# EAGLE board Case_c (EAGLE 9.7.0)

Size 421.2 x 166.83 mm. Coordinates in mm from the lower left corner, seen from the top.
Outline: 0,0 421.2,0 421.2,166.83 0,166.83 0,0
Copper layers (1*16): Top 0.035mm / dielectric 1.5mm / Bottom 0.035mm
Design rules "default": minimum track width 6mil, minimum drill 0.35mm, track to track 6mil, track to pad 6mil, pad to pad 6mil, via to via 6mil, smd to smd 6mil, copper to edge 40mil, drill to drill 6mil, minimum pad ring 10mil, minimum via ring 8mil, stop-mask expansion 4mil, vias tented up to drill 0mil, thermal gap 10mil

## Footprints (pad centres in the part's own frame; a part is rotated, then mirrored left to right if it is on the bottom)
LEDRD254W60D565H860B_G = drill 0.981 pad 1.581: 1 -1.27,0; 2 1.27,0
LEDRD254W60D565H860B = drill 0.981 pad 1.581: 1 -1.27,0; 2 1.27,0
LEDRD254W60D565H860B_Y = drill 0.981 pad 1.581: 1 -1.27,0; 2 1.27,0
PIEZO = drill 1 pad 1.6: 1 -3.5,0; 2 3.5,0
1X02 = drill 1.016 long: 1 -1.27,0; 2 1.27,0
RESAD1016W63L850D250B = drill 0.83 pad 1.43: 1 -5.08,0; 2 5.08,0
SWITCH-MOMENTARY-PTH-6.5MM = drill 1.016 pad 1.88: 1 -3.251,2.261; 2 3.251,2.261; 3 -3.251,-2.261; 4 3.251,-2.261
SG90 = drill 1.016 long: 1 -2.54,0; 2 0,0; 3 2.54,0
ARDUINO-UNO-R3-SHIELD = drill 1.016 pad 1.88: 3.3V 24.13,-2.54; 5V 24.13,0; A0 24.13,12.7; A1 24.13,15.24; A2 24.13,17.78; A3 24.13,20.32; A4 24.13,22.86; A5 24.13,25.4; AREF -24.13,-13.97; D2 -24.13,20.32; D3 -24.13,17.78; D4 -24.13,15.24; D5 -24.13,12.7; D6 -24.13,10.16; D7 -24.13,7.62; D8 -24.13,3.81; D9 -24.13,1.27; D10 -24.13,-1.27; D11 -24.13,-3.81; D12 -24.13,-6.35; D13 -24.13,-8.89; GND@0 24.13,2.54; GND@1 24.13,5.08; GND@2 -24.13,-11.43; IOREF 24.13,-7.62; NC 24.13,-10.16; RES 24.13,-5.08; RX -24.13,25.4; SCL -24.13,-19.05; SDA -24.13,-16.51; TX -24.13,22.86; VIN 24.13,7.62

## Placement (x,y rotation side)
DRG1  GREEN  [LEDRD254W60D565H860B_G]  334.71,129.97 180 top
DRG2  GREEN  [LEDRD254W60D565H860B_G]  203.36,156.04 180 top
DRR1  RED  [LEDRD254W60D565H860B]  368.91,130.31 180 top
DRR2  RED  [LEDRD254W60D565H860B]  237.89,156.04 180 top
DRW1  RED  [LEDRD254W60D565H860B]  93.88,158.92 180 top
DRW2  RED  [LEDRD254W60D565H860B]  124.18,158.45 180 top
DRY1  YELLOW  [LEDRD254W60D565H860B_Y]  351.64,130.65 180 top
DRY2  YELLOW  [LEDRD254W60D565H860B_Y]  222.32,156.38 180 top
PIEZO1  PIEZO  [PIEZO]  274.11,141.39 0 top
R1  FORCE-SENSOR  [1X02]  260.23,57.77 0 top
R2  470  [RESAD1016W63L850D250B]  335.98,124.89 90 top
R3  470  [RESAD1016W63L850D250B]  352.91,125.57 90 top
R4  470  [RESAD1016W63L850D250B]  370.18,125.23 90 top
R5  470  [RESAD1016W63L850D250B]  204.63,150.96 90 top
R6  470  [RESAD1016W63L850D250B]  223.59,151.3 90 top
R7  470  [RESAD1016W63L850D250B]  239.16,150.96 90 top
R8  330  [RESAD1016W63L850D250B]  95.15,153.84 90 top
R9  330  [RESAD1016W63L850D250B]  125.45,153.37 90 top
R10  220  [RESAD1016W63L850D250B]  259.25,136.67 90 top
RFSR1  FORCE-SENSOR  [1X02]  415.49,59.27 0 top
RR_BY2  470k  [RESAD1016W63L850D250B]  294.77,104.92 90 top
RR_BYP1  470k  [RESAD1016W63L850D250B]  356.49,8.97 90 top
RR_PD1  10k  [RESAD1016W63L850D250B]  329.64,17.23 90 top
RR_PD2  10k  [RESAD1016W63L850D250B]  311.69,104.58 90 top
S1  SWITCH_MOMENTARY  [SWITCH-MOMENTARY-PTH-6.5MM]  186.2,44.87 90 top
SERVO1  SERVOSG90  [SG90]  7.06,76.87 0 top
U1  ARDUINO-UNO-R3-SHIELD  [ARDUINO-UNO-R3-SHIELD]  202.99,88.54 270 top

## Library data of the parts
DRG1 DRG2 = Tinkercad; CATEGORY: Opto-Electronic; SUB-CATEGORY: LED; VALUE: LED_GREEN
DRR1 DRR2 DRW1 DRW2 = Tinkercad; CATEGORY: Opto-Electronic; SUB-CATEGORY: LED; VALUE: LED_RED
DRY1 DRY2 = Tinkercad; CATEGORY: Opto-Electronic; SUB-CATEGORY: LED; VALUE: LED_YELLOW
PIEZO1 R1-R10 RFSR1 RR_BY2 RR_BYP1 RR_PD1 RR_PD2 S1 SERVO1 U1 = Tinkercad

## Nets
DRG1_A: DRG1.1 R2.2
DRG2_A: DRG2.1 R5.2
DRR1_A: DRR1.1 R4.2
DRR2_A: DRR2.1 R7.2
DRW1_A: DRW1.1 R8.2
DRW2_A: DRW2.1 R9.2
DRY1_A: DRY1.1 R3.2
DRY2_A: DRY2.1 R6.2
PIEZO1_1: PIEZO1.1 R10.1
U1_5V: R1.1 RFSR1.1 RR_BY2.1 RR_BYP1.2 SERVO1.1 SERVO1.2 U1.5V
U1_A0: RFSR1.2 RR_BYP1.1 RR_PD1.1 U1.A0
U1_A1: R1.2 RR_BY2.2 RR_PD2.2 U1.A1
U1_D2: S1.3 U1.D2
U1_D3: R2.1 R5.1 U1.D3
U1_D4: R3.1 R6.1 U1.D4
U1_D5: R4.1 R7.1 U1.D5
U1_D6: R9.1 U1.D6
U1_D7: R8.1 U1.D7
U1_D8: R10.2 U1.D8
U1_D9: SERVO1.3 U1.D9
U1_GND: DRG1.2 DRG2.2 DRR1.2 DRR2.2 DRW1.2 DRW2.2 DRY1.2 DRY2.2 PIEZO1.2 RR_PD1.2 RR_PD2.1 S1.2 U1.GND@0 U1.GND@1 U1.GND@2

## Tracks (layer width: path | path; a pad name or v marks a point on that pad's centre or on a via)
DRG1_A  (1 unrouted)
DRG2_A  (1 unrouted)
DRR1_A  (1 unrouted)
DRR2_A  (1 unrouted)
DRW1_A  (1 unrouted)
DRW2_A  (1 unrouted)
DRY1_A  (1 unrouted)
DRY2_A  (1 unrouted)
PIEZO1_1  (1 unrouted)
U1_5V  (6 unrouted)
U1_A0  (3 unrouted)
U1_A1  (3 unrouted)
U1_D2  (1 unrouted)
U1_D3  (2 unrouted)
U1_D4  (2 unrouted)
U1_D5  (2 unrouted)
U1_D6  (1 unrouted)
U1_D7  (1 unrouted)
U1_D8  (1 unrouted)
U1_D9  (1 unrouted)
U1_GND  (14 unrouted)